# Altium PCB PROC106B_ASCII.PcbDoc (part 6 of 8)
Units mil, origin at the board's own origin, x right, y up, seen from the top; angles counter-clockwise.
Board outline 4498.18 x 1060.53 mil, 8 copper layers (Top Layer, GND1, Sig1, PWR1, PWR2, Sig2, GND2, Bottom Layer), stack 69.602 mil thick; 439 components, 327 nets, 1548 pads, 843 vias.
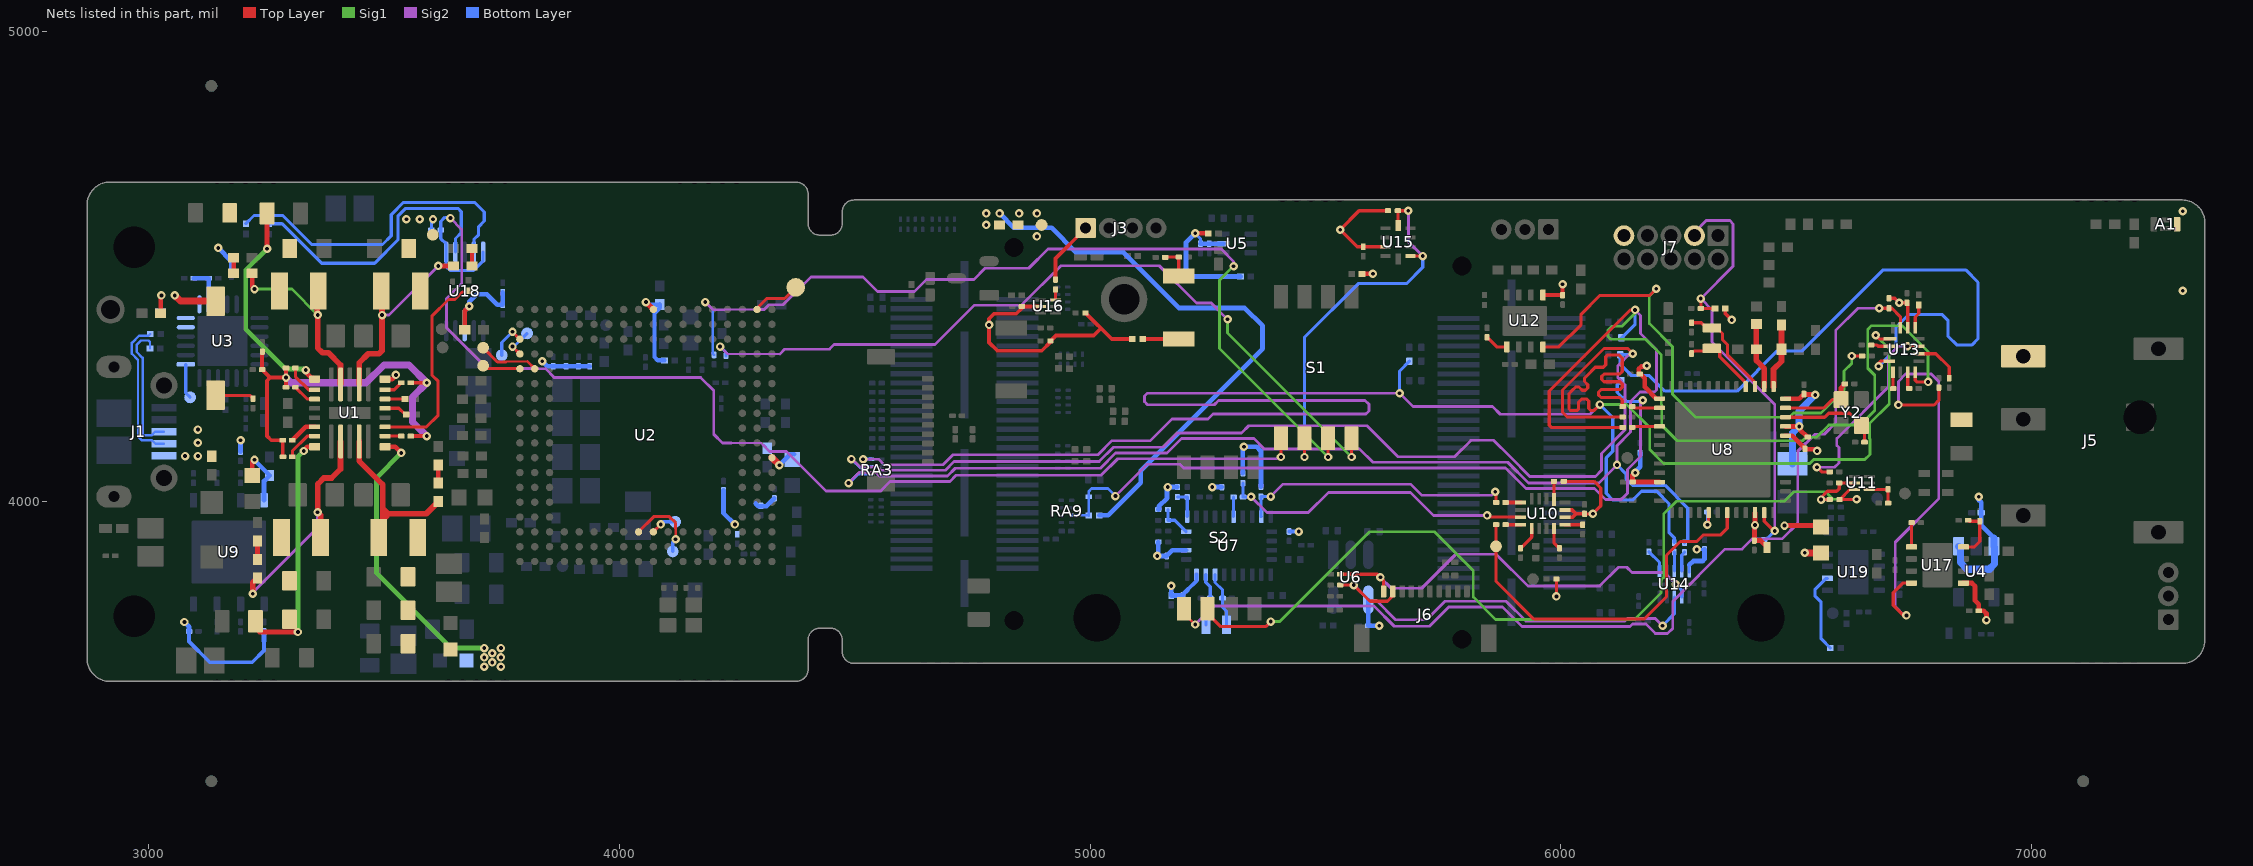
[diagram p12: the nets of this part, all layers, seen from the top]

## Via types
v1: diameter 18, hole 8, Top Layer to Bottom Layer, tented both sides, 804 vias
v2: diameter 19.68, hole 7.87, Top Layer to Bottom Layer, tented both sides, 34 vias
v3: diameter 20, hole 10, Top Layer to Bottom Layer, tented both sides, 3 vias
v4: diameter 18, hole 8, Top Layer to Bottom Layer, 1 vias
v5: diameter 17, hole 7.87, Top Layer to Bottom Layer, 1 vias

## Nets (pads, with @x,y where several pads share a name; then routed paths per layer and width w, separated by ;. In a path a pad name is that pad's centre, name@x,y a point inside that pad or via, vN(x,y) a via of type N, cw(c..) or ccw(c..) an arc to the next point about the centre after c; other vN are vias at no path point) (continued)
NetR87_2: R87.2 U8.14 | length 60.1
  Top Layer w6.7: R87.2@6151.19,4202.46 6154.4,4199.26 6195.18,4199.26 6195.18,4199.69 U8.14@6209.52,4199.69
NetR92_1: R92.1 U19.2 | length 173.6
  Bottom Layer w6.7: U19.2@6566.06,3837.67 6563.27,3837.67 6540.08,3814.48 6540.08,3799.65 6552.66,3787.07 6552.66,3709.28 R92.1@6572.2,3689.74
NetR97_1: R97.1 U7.11 | length 41.7
  Bottom Layer w6.7: U7.11@5304.72,3968.74 R97.1@5304.72,4010.48
NetR99_1: R99.1 U10.12 | length 46.8
  Top Layer w6.7: U10.12@5985.18,3943.7 5985.18,3913.36 R99.1@5996.83,3901.71
NetR100_2: R100.2 U10.5 | length 31.9
  Top Layer w8: R100.2@5882.43,3998.82 U10.5@5914.31,3998.82
NetR101_1: R101.1 U10.13 | length 37.4
  Top Layer w8: U10.13@6008.8,3951.58 R101.1@6046.19,3951.58
NetR105_1: R105.1 R106.1 U11.1 | length 69.1
  Top Layer w6.7: U11.1@6655.07,4026.51 R106.1@6695.04,4026.51 R105.1@6695.04,3997.34
NetR111_1: R111.1 SW3.2 | length 77.2
  Top Layer w8: R111.1@5111.53,4345.88 SW3.2@5188.73,4345.88
NetR112_2: R112.2 U10.8 | length 31.9
  Top Layer w8: R112.2@5882.43,3951.7 5882.56,3951.58 U10.8@5914.31,3951.58
NetR113_2: R113.2 U10.9 | length 51.8
  Top Layer w6.7: R113.2@5914.31,3901.71 5937.93,3925.33 U10.9@5937.93,3943.7
NetR115_2: R115.2 R134.1 U17.8 | length 110.4
  Top Layer w6.7: U17.8@6854.9,3904.39 6878.17,3904.39 6889.78,3916 R134.1@6889.78,3961 ; R115.2@6864.81,3961 6866.81,3959 R134.1@6889.73,3959
NetR116_1: R116.1 U17.1 | length 51.7
  Top Layer w6.7: U17.1@6744.66,3904.39 6744.66,3955.88 R116.1@6744.78,3956
NetR120_1: R120.1 U17.4 | length 925.6
  Top Layer w6.7: v1(6716.81,4206) 6792.81,4206 6802.81,4216 R120.1@6802.81,4242.98 ; v1@6734.81,3758 v1(6733.81,3759) 6727.34,3759 6705.81,3780.52 6705.81,3807.03 6726.4,3827.61 U17.4@6744.66,3827.61
  Sig2 w5.95: v1(6716.81,4206) 6716.81,4256 6732.28,4271.47 6786.63,4271.47 6802.79,4255.32 6802.79,4006.91 6710.22,3914.35 6710.22,3777.92 6729.14,3759 v1(6733.81,3759)
NetR121_1: R121.1 U13.2 | length 39.5
  Top Layer w6.7: R121.1@6659.06,4333.23 6671.58,4333.23 6674.18,4330.63 U13.2@6697.44,4330.63
NetR123_1: R123.1 U12.1 | length 50.3
  Top Layer w6.7: R123.1@5843.14,4349.69 5863.49,4329.34 U12.1@5885.05,4329.34
NetR125_2: R125.2 R129.1 SW3.1 | length 69.8
  Top Layer w5.5: R129.1@5159.27,4519.45 R129.1@5159.85,4520.03 ; SW3.1@5188.33,4480.14 SW3.1@5188.73,4479.74
  Top Layer w6.7: R129.1@5159.85,4520.03 R125.2@5188.33,4520.03 SW3.1@5188.33,4480.14
NetR127_1: R127.1 U12.4 | length 1065
  Top Layer w6.7: U12.4@5961.82,4329.34 5995.51,4329.34 6042.85,4376.69 6042.85,4399.01 6082.33,4438.49 6188.48,4438.49 v1(6202.62,4452.64) ; v1(6617.81,4310) R127.1@6639.79,4310
  Sig1 w5.95: v1(6202.62,4452.64) 6187.81,4437.82 6187.81,4378.93 6237.06,4329.68 6237.06,4228.74 6285.98,4179.83 6485.43,4179.83 6494.43,4188.83 6552.42,4188.83 6601.34,4237.75 6601.34,4277.82 6617.81,4294.3 v1(6617.81,4310)
NetR128_1: R128.1 U13.5 | length 35
  Top Layer w5.5: U13.5@6705.32,4275.51 6705.32,4241.13 R128.1@6705.74,4240.71
NetR131_2: R131.2 U8.29 | length 53.8
  Top Layer w6.7: v1(6311.16,3951.46) 6313.85,3954.16 U8.29@6313.85,3977.25
  Bottom Layer w6.7: v1(6311.16,3951.46) R131.2@6311.16,3978.41
NetR136_1: R136.1 U13.7 | length 35.8
  Top Layer w6.7: U13.7@6736.81,4275.51 6736.81,4244 R136.1@6739.81,4241
NetR139_1: R139.1 U13.10 | length 102.2
  Top Layer w6.7: U13.10@6760.43,4314.88 6796.57,4314.88 6824.81,4286.64 R139.1@6824.81,4263 R139.1@6823.09,4264.72
NetR141_1: R141.1 U13.13 | length 51.3
  Top Layer w6.7: U13.13@6752.56,4370 6752.56,4392.75 6760.03,4400.22 R141.1@6760.03,4418.23
NetR160_1: R160.1 U14.10 | length 42.6
  Bottom Layer w6.7: U14.10@6256.79,3852.92 6256.79,3887.29 R160.1@6262.64,3893.14
NetR161_2: R161.2 U8.16 | length 59.1
  Top Layer w6.7: R161.2@6151.19,4158.46 6153.05,4160.32 U8.16@6209.52,4160.32
NetR166_1: R166.1 U14.9 | length 40.8
  Bottom Layer w6.7: R166.1@6240.62,3893.58 6241.04,3893.15 U14.9@6241.04,3852.92
NetR168_1: R168.1 U14.7 | length 50.9
  Bottom Layer w6.7: R168.1@6186.75,3894.37 6209.55,3871.58 U14.7@6209.55,3852.92
NetR176_1: R176.1 S3.1 | length 82.3
  Top Layer w6.7: S3.1@3142.31,4226.42 3214.75,4226.42 R176.1@3221.71,4219.46
NetR178_2: R178.2 U16.3 | length 22.1
  Top Layer w6.7: U16.3@4926.29,4429.06 R178.2@4926.29,4451.18
NetTP2_1: TP2.1 U2.C10 | length 160.9
  Top Layer w5: v1(4119.47,3920.65) 4119.47,3943.6
  Top Layer w6.7: U2.C10@4040.73,3936.4 4073.08,3968.75 4106.27,3968.75 4119.47,3955.55 4119.47,3943.6
  Bottom Layer w6.7: TP2.1@4113.44,3894.78 4113.44,3914.63 v1(4119.47,3920.65)
NetTP3_1: TP3.1 U2.C9 | length 55
  Top Layer w6.7: U2.C9@4072.23,3936.4 v1(4087.98,3952.15)
  Bottom Layer w6.7: v1(4087.98,3952.15) 4093.63,3957.8 TP3.1@4118.39,3957.8
NetTP6_1: TP6.1 U2.T18 | length 81.8
  Top Layer w6.7: v1(3773.02,4361.6) U2.T18@3788.76,4345.85
  Bottom Layer w6.7: TP6.1@3750.12,4311.58 3750.12,4338.7 v1(3773.02,4361.6)
NetTP7_1: TP7.1 U2.R18 | length 64.8
  Top Layer w6.7: v1(3773.02,4330.1) U2.R18@3788.76,4314.36
  Bottom Layer w6.7: v1(3773.02,4330.1) 3776.1,4330.1 TP7.1@3804,4358
NetTP8_1: TP8.1 U2.P17 | length 129.1
  Top Layer w5: 3759.24,4297.12 3760.35,4298.23 3804.89,4298.23
  Top Layer w6.7: TP8.1@3710.6,4327.53 3741.01,4297.12 3759.24,4297.12 ; 3804.89,4298.23 U2.P17@3820.26,4282.86
NetTP9_1: TP9.1 U2.P18 | length 81.4
  Top Layer w6.7: TP9.1@3710.6,4289.4 3716.29,4283.71 3788.76,4283.71 U2.P18@3788.76,4282.86
NetTP11_1: TP11.1 U2.V2 | length 102.4
  Top Layer w6.7: U2.V2@4291.28,4410.27 4313.18,4432.17 4351.05,4432.17 TP11.1@4374.76,4455.87
NetTP26_1: TP26.1 U3.1 | length 74
  Bottom Layer w6.7: U3.1@3078.98,4292.21 3078.98,4231.25 TP26.1@3088.22,4222.02
nRESET: C37.1 J7.3 R89.1 R91.1 U8.35 | length 976.9
  Top Layer w6.7: v1(6297.21,4431.94) C37.1@6297.21,4411.08 R89.1@6327.17,4411.08 ; U8.35@6431.96,3977.25 6431.96,3958.78 6452.3,3938.44 v1(6454.22,3938.44)
  Sig2 w5.95: J7.3@6283.84,4565.56 6283.84,4572.59 6308.82,4597.58 6358.86,4597.58 6365.86,4590.57 6365.86,4500.59 v1(6297.21,4431.94) 6321.18,4407.97 6321.18,4339.63 6454.22,4206.59 v1(6454.22,3938.44)
  Bottom Layer w6.7: R91.1@6432.17,3920.53 ccw(c6432.17,3930.54) 6439.24,3923.46 v1(6454.22,3938.44)
PGOOD: R31.2 R37.2 R155.2 RA9.7 | length 1608.1
  Sig2 w5.95: v1(5053.68,4012.45) 5121.06,4079.83 5191.42,4079.83 5198.95,4072.3 5882.26,4072.3 5926.17,4028.39 6071.12,4028.39 6094.51,4005.01 6128.26,4005.01 6141.61,4018.37 6141.61,4069.02 6169,4096.41 6169,4210.88 v1(6173.93,4215.81)
  Bottom Layer w5.95: RA9.7@4960.68,3971.89 4996.54,3971.89 R31.2@4997.02,3971.4 R37.2@4997.02,4011.07 4997.02,4022.43 5003.06,4028.46 5037.66,4028.46 v1(5053.68,4012.45)
  Bottom Layer w6.7: R155.2@6128.35,4257.57 6119.84,4249.06 6119.84,4232.32 6138.6,4213.55 6171.67,4213.55 v1(6173.93,4215.81)
PMIC_1V0: C46.2 C49.2 C54.2 L4.1 L12.1 L14.1 U1.1 | length 615.9
  Top Layer w10: U1.1@3502.28,4117.15 3523.82,4117.15 v1(3536.85,4104.13)
  Sig1 w10: v1(3536.85,4104.13) 3484.27,4051.55 3484.27,3848.75 3643.34,3689.68 v1@3717.17,3689.68
  other v1: 3712.91,3649.87 3748.46,3649.87 3730.24,3659.02 3712.91,3669.78 3748.46,3669.78 3730.24,3678.68 3712.91,3689.68 3748.46,3689.68
PMIC_1V2: C45.2 C77.2 L3.1 L13.1 U1.14 | length 457.1
  Top Layer w10: v1(3251.69,4537.83) L13.1@3251.69,4612.77 ; v1(3333.63,4280.07) 3335.17,4278.54 3335.17,4274.43 3345.86,4263.73 3349.8,4263.73 U1.14@3352.68,4260.85
  Sig1 w10: v1(3251.69,4537.83) 3206.5,4492.63 3206.5,4366.82 3290.78,4282.54 3331.16,4282.54 v1(3333.63,4280.07)
PMIC_1V8: C47.2 C48.2 L5.1 L11.1 U1.21 | length 522.1
  Top Layer w10: L11.1@3235.24,3746.61 3235.24,3723.69 v1(3317.18,3723.69) ; v1(3329.65,4108.18) 3329.65,4109.63 3337.17,4117.15 U1.21@3352.68,4117.15
  Sig1 w10: v1(3317.18,3723.69) 3317.18,4095.71 v1(3329.65,4108.18)
PMIC_3V3: C2.1 C3.1 C44.2 C87.1 C88.1 C100.2 C101.2 C102.1 C126.2 FL22.1 L2.1 R2.2 R4.1 R5.1 R7.2 R8.2 R9.1 R19.2 R21.2 R22.2 R23.2 R31.1 R40.1 R43.2 R44.2 R45.2 R59.2 R75.1 S3.2 TP5.1 U1.8 U2.H1 U2.V9 U3.5 U3.6 U3.7 U9.8 U18.8 | length 2613
  Top Layer w10: C3.1@3025.57,4400.66 3025.57,4436.95 v1(3027.25,4438.63) ; C100.2@3220.18,4055.96 3220.18,4084.7 v1(3225,4089.52) ; U1.8@3502.28,4260.85 3517.78,4260.85 3525.31,4268.38 v1(3525.31,4269.83) ; C126.2@3671.69,4365.53 3671.69,4406.19 v1(3681.35,4415.85)
  Top Layer w12: v1(4056.48,4424.59) U2.V9@4072.23,4408.84
  Top Layer w15: v1(3055.45,4438.63) 3067.65,4426.42 S3.2@3142.31,4426.42 ; U2.H1@4324.2,4093.88 v1(4339.94,4078.14)
  Bottom Layer w6.7: R19.2@3600.71,4577.6 3600.71,4597.2 v1(3604.12,4600.61)
  Bottom Layer w8: R44.2@3085.96,3724.94 3085.96,3703.29 3129.87,3659.38 3220.09,3659.38 3245.35,3684.64 3245.35,3704.34
  Bottom Layer w9: C88.1@4085.98,4412.26 4074.41,4400.69 4074.41,4307.92 4081.57,4300.76 R2.2@4095.9,4300.76
  Bottom Layer w10: v1(3076.13,3744.96) 3085.96,3735.12 R44.2@3085.96,3724.94 ; v1(3147.81,4539.54) 3175.78,4511.57 R40.1@3175.78,4498.14 ; R45.2@3195.34,4107.12 v1@3195.34,4127.87 ; v1(3225,4089.52) 3225,4088.24 C101.2@3257.08,4056.16 3245.35,4044.42 U9.8@3245.35,4003.53 ; 3245.35,3704.34 R43.2@3245.35,3724.94 ; U18.8@3671.35,4363.67 3671.35,4405.85 v1(3681.35,4415.85) 3681.35,4425.6 3696.63,4440.88 3718.65,4440.88 3740.67,4418.85 R4.1@3752.34,4418.85 ; R4.1@3752.34,4418.85 R5.1@3752.34,4445.45 ; v1(3836.01,4298.61) 3846.58,4288.04 R21.2@3859.46,4288.04 R22.2@3886.73,4288.04 R23.2@3913.05,4288.04 R59.2@3936.98,4288.04 ; v1(4056.48,4424.59) 4062.15,4418.92 C88.1@4085.98,4418.92 ; C88.1@4085.98,4412.26 C88.1@4085.98,4418.92 ; C88.1@4085.98,4419.22 C88.1@4085.98,4418.92 ; R8.2@4221.23,4024.4 4221.23,3976.38 v1(4245.46,3952.15) ; 4289.86,3996.55 4295.2,3991.21 4295.2,3990.68 4312.51,3990.68 R7.2@4329.25,4007.42 ; v1(4339.94,4078.14) 4359.11,4097.3 4362.93,4101.12 C102.1@4371,4101.12 ; v1(4807.67,4612.77) 4838.24,4582.2 4918.25,4582.2 4969.72,4530.73 5070.03,4530.73 5188.98,4411.77 5328.57,4411.77 5366.24,4374.1 5366.24,4325.35 5107.47,4066.58 5107.47,4040.46 5038.41,3971.4 R31.1@5019.07,3971.4
  other v1: 3195.34,4131.09 4779.42,4588.36 3547.73,4600.61 3575.93,4600.61 4779.42,4612.77
PMIC_CLK: R103.2 U1.3 | length 438.9
  Top Layer w6.7: U1.3@3502.28,4159.48 3590.4,4159.48 3615,4184.08 3615,4256.43 3601.71,4269.72 3601.71,4394.6 3637.2,4430.1 3650.77,4430.1 3666.52,4445.85 3676.68,4445.85 R103.2@3679.35,4448.51
PMIC_EN1: R34.1 U1.7 | length 40.7
  Top Layer w6.7: U1.7@3502.28,4238.22 3521.94,4238.22 R34.1@3536.85,4253.13
PMIC_EN2: R35.1 U1.15 | length 70.7
  Top Layer w6.7: R35.1@3311.94,4284.61 3311.94,4266.28 3340.01,4238.22 U1.15@3352.68,4238.22
PMIC_EN3: R36.1 U1.2 | length 34.6
  Top Layer w6.7: U1.2@3502.28,4139.79 R36.1@3536.85,4139.79
PMIC_NINT: R26.1 U1.19 | length 59.2
  Top Layer w10: R26.1@3305.25,4131.09 3333.63,4159.48 U1.19@3352.68,4159.48
PMIC_NRST: R33.1 U1.20 | length 72.5
  Top Layer w6.7: R33.1@3305.52,4095.96 3305.52,4108.18 3337.13,4139.79 U1.20@3352.68,4139.79
PMIC_PGOOD: R25.1 U1.16 | length 51.1
  Top Layer w6.7: R25.1@3311.94,4243.48 3336.89,4218.53 U1.16@3352.68,4218.53
PMIC_SCL: R32.2 U1.5 | length 48
  Top Layer w6.7: U1.5@3502.28,4198.85 3531.78,4198.85 R32.2@3544.85,4185.79
PMIC_SDA: R28.2 U1.6 | length 42.6
  Top Layer w5.5: R28.2@3544.85,4218.48 R28.2@3544.85,4218.48
  Top Layer w6.7: U1.6@3502.28,4218.53 R28.2@3544.85,4218.48
PMICVIO_3V3: R25.2 R26.2 R33.2 R34.2 R35.2 R36.2 R50.1 R52.2 | length 878.4
  Top Layer w8: R50.1@3241.63,4319.41 3241.09,4318.88 R52.2@3241.09,4281.06 3258.11,4264.05 ; R33.2@3285.49,4095.96 3285.23,4096.22 R26.2@3285.23,4131.09 3260.47,4131.09 3251.36,4140.2 3251.36,4257.3 3258.11,4264.05 ; R25.2@3291.92,4243.48 v1(3291.92,4264.05) ; R35.2@3291.92,4284.61 v1(3291.92,4264.05) ; R36.2@3556.87,4139.79 v1(3590.95,4139.79) ; R34.2@3556.87,4253.13 v1(3590.95,4253.13) ; 3258.11,4264.05 v1(3291.92,4264.05)
  Sig2 w15: v1(3291.92,4264.05) 3302.83,4253.13 3462.07,4253.13 3499.77,4290.83 3553.26,4290.83 v1(3590.95,4253.13) 3560.74,4222.92 3560.74,4170 v1(3590.95,4139.79)
PS0: R77.2 R93.1 U7.6 | length 62.7
  Bottom Layer w6.7: R77.2@5185.3,4010.48 R93.1@5206.3,4010.48 U7.6@5206.3,3968.74
PS1: R78.2 R98.1 U7.5 | length 71.4
  Bottom Layer w6.7: R78.2@5165.52,3984 R98.1@5165.52,3961 5179.58,3961 U7.5@5203.84,3936.75
RE: A1.1
  other v1: 7320.92,4448.37 7320.92,4617.37
RESETN: R94.1 U10.1 | length 39
  Top Layer w6.7: U10.1@5985.18,4004.73 R94.1@5985.18,4043.69
RF_N: C23.1 L6.1 U8.2 | length 139.8
  Top Layer w12: L6.1@6415.18,4377.75 6415.09,4377.66 C23.1@6415.09,4324.42 6415.09,4300.45 6431.96,4283.58 U8.2@6431.96,4244.97
RF_P: C22.2 L1.1 U8.1 | length 137.8
  Top Layer w12: U8.1@6451.65,4244.97 6451.65,4281.73 6468.52,4298.6 L1.1@6468.52,4324.41 C22.2@6468.51,4375.79
SENS_INT: R18.2 R100.1 U7.14 | length 589
  Top Layer w6.7: v1(5860.53,4021.62) 5862.41,4019.74 R100.1@5862.41,3998.82
  Sig2 w5.95: v1(5383.46,4011.31) 5409.9,4037.75 5680.81,4037.75 5704.56,4014 5852.9,4014 v1(5860.53,4021.62)
  Bottom Layer w5.5: R18.2@5362.78,4011.28 R18.2@5363.28,4010.78
  Bottom Layer w6.7: U7.14@5363.78,3968.74 5362.78,3969.74 R18.2@5362.78,4011.28 v1@5383.43,4011.28
SENS_NRST: R81.2 R97.2 U10.7 | length 677
  Top Layer w6.7: v1(5843.14,3971.4) 5846.67,3967.88 5913.76,3967.88 U10.7@5914.31,3967.32
  Sig2 w5.95: v1(5341.84,4011.07) 5375.53,3977.37 5463.23,3977.37 5506.2,4020.34 5680.27,4020.34 5729.21,3971.4 v1(5843.14,3971.4)
  Bottom Layer w5.5: v1(5341.84,4011.07) 5342.12,4010.78 5345.19,4010.78 v1@5344.89,4010.48
  Bottom Layer w6.7: R81.2@5324.41,4039.9 5324.41,4010.82 R97.2@5324.75,4010.48 5341.25,4010.48 v1(5341.84,4011.07)
SOP0: R159.2 S1.3 | length 1902
  Top Layer w6.7: v1(5505.37,4095.46) S1.3@5505.37,4135.46
  Sig1 w5.95: v1(5304.72,4500.76) 5274.9,4470.94 5274.9,4325.94 v1(5505.37,4095.46)
  Sig2 w4.5: 4223.14,4408.84 4293.24,4408.84
  Sig2 w5.95: v1(4182.46,4424.59) 4198.79,4408.27 4222.56,4408.27 ; 4293.24,4408.84 4307.81,4408.84 4317.84,4418.87 4347.94,4418.87 4406.85,4477.78 4517.43,4477.78 4548.43,4446.78 4626.58,4446.78 4652.24,4472.44 4753.09,4472.44 4776.93,4496.28 4869.62,4496.28 4910.57,4537.24 5278.49,4537.24 5304.72,4511 v1(5304.72,4500.76)
  Bottom Layer w5: v1(4182.46,4424.59) 4198.53,4408.53 4198.26,4408.26 4198.26,4315.13 R159.2@4201.23,4312.16
SOP1: R171.2 S1.4 | length 1675.6
  Top Layer w6.7: v1(5555.37,4095.46) S1.4@5555.37,4135.46
  Sig1 w5.95: v1(5292.01,4387.88) 5292.01,4358.83 v1(5555.37,4095.46)
  Sig2 w4.5: v1(4213.96,4330.1) 4229.71,4314.36 4341.35,4314.36
  Sig2 w5.95: 4341.35,4314.36 4351.45,4324.45 4446.13,4324.45 4456.22,4334.55 4670.75,4334.55 4754.18,4417.98 4854.38,4417.98 4937.96,4501.55 5146.92,4501.55 5225.73,4422.74 5257.14,4422.74 v1(5292.01,4387.88)
  Bottom Layer w6.7: v1(4213.96,4330.1) 4226.45,4317.61 R171.2@4226.45,4310.42
SPI/CAN_MUX_CTRL: R118.1 S2.1 U13.15 | length 2179.9
  Top Layer w5.5: S2.1@5199.37,3773.46 5194.37,3768.46 v1(5223.17,3739.66)
  Top Layer w6.7: v1(6676.29,4411.48) R118.1@6696.81,4411.48 6703.33,4411.48 6721.06,4393.75 U13.15@6721.06,4370
  Sig2 w5.95: v1(5223.17,3739.66) 5262.38,3778.87 5602.98,3778.87 5646.06,3735.8 5720.58,3735.8 5761.88,3777.1 5875.72,3777.1 5917.56,3735.26 6146.44,3735.26 6151.79,3740.61 6180.59,3740.61 6200.56,3720.65 6226.68,3720.65 6237.45,3731.42 6237.45,3788.77 6348.32,3899.63 6384.69,3899.63 6407.03,3921.97 6470.34,3921.97 6503.17,3954.8 6503.17,4107.57 6539.43,4143.83 6559.48,4143.83 6583.65,4168 6583.65,4364.13 6631.01,4411.48 v1(6676.29,4411.48)
SPI_CLK1: R151.2 R160.2 R161.1 RA3.2 U13.8 | length 4325
  Top Layer w6.7: R161.1@6131.17,4158.46 5979.38,4158.46 5975.27,4162.58 5975.27,4235.61 6147.42,4407.76 v1(6157.61,4407.76) ; U13.8@6752.56,4275.51 6752.56,4258.25 6755.81,4255 v1(6779.81,4255)
  Sig1 w5.95: v1(6157.61,4407.76) 6157.61,4400.83 6130.04,4373.26 6108.23,4373.26 6099.8,4364.84 6099.8,4351.52 6105.77,4345.55 6179.95,4345.55 6213.27,4312.23 6213.27,4206.95 6214.25,4205.98 6214.25,4162.84 6247.09,4130 6513.57,4130 6520.9,4137.33 6543.07,4137.33 6569.11,4163.38 6635.6,4163.38 6666.75,4194.52 6666.75,4269.04 6651.85,4283.94 6651.85,4366.63 6659.6,4374.38 6724.74,4374.38 6779.81,4319.31 v1(6779.81,4255)
  Sig2 w5.95: v1(4486.92,4040) 4509.41,4062.49 4544.84,4062.49 4552.13,4055.2 4697.06,4055.2 4713.43,4071.58 5021.63,4071.58 5053.67,4103.62 5163.24,4103.62 5194.28,4134.66 5347.84,4134.66 5369.78,4112.71 5572.06,4112.71 5600.59,4084.19 5887.19,4084.19 5931.09,4040.29 6080.55,4040.29 6118.88,4078.61 v1(6119.14,4078.61) 6119.14,4119.33 6148.08,4148.27 6148.08,4213.05 6168.31,4233.27 6198.76,4233.27 6203.07,4237.58 6203.07,4323.68 6169.29,4357.46 6169.29,4396.08 v1(6157.61,4407.76)
  Bottom Layer w6.7: v1(4486.92,4040) 4506.08,4059.16 4531.17,4059.16 4531.36,4059.36 RA3.2@4535.95,4059.36 ; v1(6119.14,4078.61) 6138,4059.75 6138,4049.46 6152.39,4035.07 6221.28,4035.07 6269.58,3986.76 6269.58,3920.11 R160.2@6262.64,3913.17 ; R151.2@6128.21,4348.48 6129,4348.48 6157.61,4377.09 v1(6157.61,4407.76)
SPI_CLK1_T: J6.1 R185.1 U14.2 | length 879.9
  Top Layer w6.7: R185.1@5531.01,3846.49 5609.9,3846.49 v1(5616.61,3839.78) 5623.32,3833.07 J6.1@5623.32,3810.06
  Sig2 w5.95: v1(5616.61,3839.78) 5639.62,3816.77 5704.53,3816.77 5776.5,3888.73 5862.44,3888.73 5929.9,3821.27 6082.33,3821.27 6122.39,3861.33 6139.78,3861.33 6151.11,3850 6219.39,3850 v1(6244.03,3825.36)
  Bottom Layer w6.7: v1(6244.03,3825.36) 6256.79,3812.6 U14.2@6256.79,3797.8
SPI_CS1: R74.1 U13.11 | length 429.1
  Top Layer w5.5: v1(6736.18,4330.63) U13.11@6760.43,4330.63
  Top Layer w6.7: v1(6543.91,4073.7) 6544.18,4073.7 6553.96,4063.92 R74.1@6571.09,4063.92
  Sig2 w5.95: v1(6543.91,4073.7) 6581.52,4073.7 6590.67,4082.85 6590.67,4115.3 6586.1,4119.86 6586.1,4135.05 6695.76,4244.71 6695.76,4309.35 6717.05,4330.63 v1(6736.18,4330.63)
SPI_CS_MUX_CTRL: R104.1 S2.2 U11.6 | length 1884.9
  Top Layer w6.7: S2.2@5249.37,3773.46 5249.37,3763.6 5277.84,3735.13 5372.76,3735.13 v1(5383.46,3745.84) ; U11.6@6623.57,4026.51 6613.5,4026.51 R104.1@6591.99,4005 6622.99,4005 6623.57,4005.59 v1(6628.05,4005.59)
  Sig1 w5.95: v1(5383.46,3745.84) 5402.84,3745.84 5593.62,3936.62 5731.27,3936.62 5813.97,3853.92 5813.97,3797.67 5861.45,3750.19 6156.27,3750.19 6212.51,3806.42 6212.51,3833.75 6218.27,3839.5 6218.27,3974.42 6245.38,4001.54 6474.92,4001.54 6495.07,4021.7 6561.94,4021.7 6578.05,4005.59 v1(6628.05,4005.59)
SPI_MISO1: R87.1 R154.1 R166.2 RA3.4 U13.1 | length 4756.8
  Top Layer w6.7: 6063.42,4193.97 6069.81,4193.97 v1(6082.75,4206.91) ; 6063.42,4194.34 6059.2,4198.55 6059.2,4214.4 6055.19,4218.42 6043.75,4218.42 6037.53,4212.2 6037.53,4197.99 6033.52,4193.97 6020.58,4193.97 6017.07,4197.49 6017.07,4229.93 6022.97,4235.83 6031.24,4244.1 6038.32,4244.1 6045.16,4237.27 6052.24,4237.27 6056.97,4241.99 6056.97,4249.07 6050.13,4255.91 6050.13,4262.99 6055.47,4268.33 6073.09,4285.95 6089.86,4285.95 6095.36,4291.45 6095.36,4308.22 6099.58,4312.44 6123.13,4312.44 6130.34,4305.22 6130.34,4276.86 6125.33,4271.85 6091.87,4271.85 6086.86,4266.84 6086.86,4260.16 6091.87,4255.15 6125.33,4255.15 6130.34,4250.14 6130.34,4243.46 6125.33,4238.45 6085.16,4238.45 6080.15,4233.44 6080.15,4226.76 6085.16,4221.75 6125.33,4221.75 6130.34,4216.74 6130.34,4203.29 R87.1@6131.17,4202.46 ; v1(6668.81,4354) 6676.43,4346.38 U13.1@6699.41,4346.38
  Sig1 w5.95: v1(6082.75,4206.91) 6139.6,4206.91 6188.75,4157.76 6188.75,4110.98 6218.01,4081.72 6528.63,4081.72 6537.08,4090.17 6645.43,4090.17 6656.26,4101 6656.26,4133.46 6655.28,4134.44 6655.28,4166.24 6697.59,4208.55 6697.59,4294.1 6697.45,4294.25 6697.45,4317.75 6697.59,4317.9 6697.59,4325.22 v1(6668.81,4354)
  Sig2 w5.95: v1(4517.69,4090.85) 4550.12,4090.85 4561.98,4078.99 4687.2,4078.99 4708.33,4100.11 5016.53,4100.11 5046.57,4130.16 5127.86,4130.16 5174.04,4176.34 5250.52,4176.34 5260.82,4186.64 5585.45,4186.64 5592.29,4193.48 5592.29,4207.43 5584.11,4215.6 5272.9,4215.6 5263.66,4206.36 5122.15,4206.36 5115.56,4212.95 5115.56,4224.91 5121.64,4230.99 v1(5657.37,4230.99) 5685.71,4202.64 5854.79,4202.64 5871.27,4186.17 6062.01,4186.17 v1(6082.75,4206.91)
  Bottom Layer w6.7: v1(4517.69,4090.85) RA3.4@4535.95,4090.85 ; v1(5657.37,4230.99) 5657.37,4278.16 R154.1@5678.13,4298.93 ; v1(6082.75,4206.91) 6110.19,4179.47 6110.19,4107.35 6096.33,4093.49 6096.33,4018.14 6110.26,4004.22 6152.95,4004.22 6171.26,4022.52 6203.4,4022.52 6229.38,3996.55 6229.38,3935.32 6240.62,3924.08 R166.2@6240.62,3913.6
SPI_MISO1_T: J6.2 R184.1 U14.3 | length 939.9
  Top Layer w6.7: R184.1@5531.18,3823.28 v1(5560.18,3823.28) 5594.55,3788.91 5631.55,3788.91 5643.01,3800.37 J6.2@5643.01,3810.06
  Sig2 w5.95: v1(5560.18,3823.28) 5592.7,3790.77 5607.91,3790.77 5648.88,3749.8 5714.78,3749.8 5753.98,3789 5883.62,3789 5925.46,3747.16 6135.69,3747.16 6141.05,3752.51 6200.45,3752.51 v1(6215.84,3737.12)
  Bottom Layer w6.7: v1(6215.84,3737.12) 6241.04,3762.32 U14.3@6241.04,3797.8
SPI_MOSI1: R86.1 R153.2 RA3.3 U13.4 | length 3868.3
  Top Layer w6.7: R86.1@6131.02,4180.57 6013.04,4180.57 6003.51,4190.11 6003.51,4237.7 6091.65,4325.84 6141.89,4325.84 v1(6152.82,4314.92) ; v1(6674.81,4288) 6674.81,4294.5 6679.45,4299.13 U13.4@6697.44,4299.13
  Sig2 w5.95: v1(4493,4091) 4494.25,4091 4510.87,4074.38 4549.77,4074.38 4557.05,4067.1 4692.13,4067.1 4711.01,4085.97 5019.2,4085.97 5049.49,4116.26 5154.64,4116.26 5184.93,4146.55 5321.51,4146.55 5336.83,4161.88 5588,4161.88 5653.79,4096.09 5774.21,4096.09 5808.94,4130.81 5857.47,4130.81 5891.66,4096.63 5891.66,4096.54 5933.94,4054.26 6073.1,4054.26 6086.14,4067.3 6086.14,4103.14 6136.19,4153.2 6136.19,4248.75 6120.66,4264.28 6120.66,4289.02 6146.56,4314.92 v1(6152.82,4314.92)
  Bottom Layer w6.7: v1(4493,4091) 4493.79,4091 4512.23,4072.56 4525.61,4072.56 4528.16,4075.11 RA3.3@4535.95,4075.11 ; v1@6152.82,4312.59 R153.2@6126.12,4312.59 6126.12,4292.58 6150.28,4268.42 6187.86,4268.42 6220.8,4235.48 6374.36,4235.48 6459.75,4320.87 6512.8,4320.87 6684.75,4492.82 6859.64,4492.82 6886.05,4466.4 6886.05,4346.31 6873.37,4333.63 6840.48,4333.63 6822.6,4351.51 6822.6,4384.73 6808.88,4398.45 6739.36,4398.45 6711.55,4370.64 6711.55,4324.74 v1(6674.81,4288)
SRDY: R112.1 TP27.1 U8.31 | length 809.2
  Top Layer w6.7: R112.1@5862.41,3951.7 5862.41,3905.96 TP27.1@5862.18,3905.74 5862.18,3831.62 5942.67,3751.13 6176.53,3751.13 6224.18,3798.77 6224.18,3886.56 6253.68,3916.06 6288.86,3916.06 6302.89,3930.09 6339.36,3930.09 6353.22,3943.95 U8.31@6353.22,3977.25
SW0: L2.2 R53.2 U1.10 | length 440.3
  Top Layer w10: v1(3615.39,4501.24) R53.2@3647.82,4501.24
  Top Layer w12: U1.10@3447.16,4249.63 3447.16,4295.44 3466.54,4314.82 3489.47,4314.82 3495.89,4321.24 v1(3495.89,4396.79) 3495.89,4452.04 L2.2@3489.45,4458.48
  Sig2 w5.95: v1(3495.89,4396.79) 3510.94,4396.79 v1(3615.39,4501.24)
SW0_CAP: C31.1 R53.1 | length 37.1
  Top Layer w8: R53.1@3687.19,4501.24 C31.1@3687.19,4538.34
SW1: L3.2 R54.2 U1.12 | length 424.2
  Top Layer w10: R54.2@3220.03,4485.56 3220.03,4457.01 v1(3225,4452.04)
  Top Layer w12: v1(3359.17,4397.16) v1@3359.17,4395.95 ; L3.2@3365.61,4448.85 3357.96,4441.2 3357.96,4397.16 v1@3359.17,4395.95 ; U1.12@3407.79,4249.63 3407.79,4291.03 3382.08,4316.74 3369.33,4316.74 3359.17,4326.9 v1@3359.17,4395.95
  Sig1 w5.95: v1(3225,4452.04) 3304.28,4452.04 v1(3359.17,4397.16)
SW1_CAP: C32.1 R54.1 | length 32.9
  Top Layer w10: R54.1@3180.66,4485.56 C32.1@3180.66,4518.49
SW2: L4.2 R55.2 U1.25 | length 339.7
  Top Layer w12: U1.25@3447.16,4128.37 3447.16,4086.98 3497.1,4037.05 3497.1,3986.55 ; L4.2@3496.99,3961.52 L4.2@3497.1,3961.63 ; R55.2@3615.39,4000.53 3589.87,3975.02 3507.05,3975.02 ; L4.2@3497.1,3961.63 3507.05,3971.58 3507.05,3975.02 ; L4.2@3497.1,3961.63 3497.1,3986.55 ; 3497.1,3986.55 3507.05,3976.61 3507.05,3975.02
SW2_CAP: C33.2 R55.1 | length 38.8
  Top Layer w10: R55.1@3615.39,4039.9 C33.2@3615.39,4078.74
SW3: L5.2 R56.2 U1.23 | length 510.6
  Top Layer w12: v1(3221.07,3804.79) 3221.07,3828.39 R56.2@3231.35,3838.68 ; L5.2@3365.51,3919.52 3365.51,3971.86 v1(3359.07,3978.3) 3359.07,4038.18 3359.6,4038.18 3372.17,4050.75 3388.9,4050.75 3407.79,4069.64 U1.23@3407.79,4128.37
  Sig2 w5.95: v1(3221.07,3804.79) 3221.07,3807.15 3359.07,3945.15 v1(3359.07,3978.3)
SW3_CAP: C34.2 R56.1 | length 38.9
  Top Layer w10: R56.1@3231.35,3878.05 C34.2@3231.35,3917
UART_MUX_CTRL1: R19.1 S1.1 U18.1 U18.5 | length 2531.7
  Top Layer w6.7: v1(5405.37,4095.46) S1.1@5405.37,4135.46
  Sig2 w4.5: 3828.67,4282.86 3842.32,4282.86 3842.94,4283.48 ; 4237.91,4125.38 4300.76,4125.38 4304.53,4121.62
  Sig2 w5.95: v1(3641.13,4602.92) 3665.03,4579.02 3665.03,4464.29 3632.83,4432.1 3632.83,4370.07 3719.32,4283.58 3827.95,4283.58 3828.67,4282.86 ; 3842.94,4283.48 3861.83,4264.58 4172.68,4264.58 4200.64,4236.63 4200.64,4143.76 4219.02,4125.38 4237.91,4125.38 ; 4304.53,4121.62 4318.78,4107.36 4354.87,4107.36 4438.8,4023.43 4555.14,4023.43 4575.02,4043.31 4701.98,4043.31 4715.52,4056.84 5023.72,4056.84 5058.6,4091.73 5401.64,4091.73 v1(5405.37,4095.46)
  Bottom Layer w6.7: v1(3641.13,4602.92) 3639.63,4604.42 3629.45,4604.42 3620.74,4595.71 R19.1@3620.74,4577.6 3620.74,4559.26 3631.98,4548.02 U18.1@3631.98,4530.99 3631.98,4499.84 3640.25,4491.57 3690.32,4491.57 3710.72,4511.98 U18.5@3710.72,4530.99
UART_MUX_CTRL2: R1.1 S1.2 U15.1 U15.5 | length 819.7
  Top Layer w6.7: v1(5455.37,4095.46) S1.2@5455.37,4135.46 ; U15.5@5654.19,4587.22 5653.69,4587.73 R1.1@5653.69,4618.56 v1(5675.9,4618.59) ; U15.1@5680.77,4522.26 v1(5706.58,4522.26)
  Sig2 w6.7: v1(5675.9,4618.59) 5675.9,4552.94 v1(5706.58,4522.26)
  Bottom Layer w6.7: v1(5455.37,4095.46) 5455.37,4349.9 5569.14,4463.66 5671.93,4463.66 5706.58,4498.31 v1(5706.58,4522.26)
USB_5V: FL2.1 J1.1
  other v1: 3077.51,4097.43 3104.7,4097.43 3104.7,4125.62 3104.7,4153.82
USB_AR_RS232RX: R63.1 U18.2 | length 614.1
  Bottom Layer w6.7: R63.1@3255.87,4590.83 3283.69,4590.83 3367.49,4507.03 3480.1,4507.03 3529.51,4556.44 3529.51,4606.69 3546.31,4623.49 3657.2,4623.49 3664,4616.69 3664,4571.71 3651.86,4559.57 ; U18.2@3651.67,4530.99 3651.67,4559.57
USB_AR_RS232TX: R62.1 U18.4 | length 705.1
  Bottom Layer w6.7: R62.1@3206.51,4591.24 3223.81,4608.54 3284.94,4608.54 3346.73,4546.75 3497,4546.75 3515.39,4565.14 3515.39,4610.32 3541.11,4636.04 3692.88,4636.04 3713.04,4615.88 3713.04,4596.78 3701.04,4584.77 3701.04,4567.45 3691.04,4557.45 U18.4@3691.04,4530.99
USB_DM: J1.2 R60.2 | length 312.5
  Bottom Layer w5: R60.2@3003.52,4356.6 2999.85,4352.92 2979.71,4352.92 2964.56,4337.77 2964.56,4314.77 2977.52,4301.8 2977.52,4138.83 2985.04,4131.3 3006.86,4131.3 3014.61,4123.56 J1.2@3032.66,4123.56
USB_DP: J1.3 R41.2 | length 292.2
  Bottom Layer w5: R41.2@3002.89,4326.25 3002.89,4339.95 2999.92,4342.92 2983.85,4342.92 2974.56,4333.63 2974.56,4318.91 2987.41,4306.05 2987.52,4305.94 2987.52,4142.97 2989.19,4141.3 3006.11,4141.3 3013.95,4149.15 J1.3@3032.66,4149.15
VBUS: R64.2 R65.2 U3.8 | length 87
  Bottom Layer w10: R64.2@3096.15,4475.15 R65.2@3127.78,4475.15 U3.8@3127.78,4419.75
VCC_BA_3V3: C5.1 C6.2 C9.2 C10.2 C11.1 C12.2 C40.1 C72.2 C105.2 C107.1 C109.2 C117.1 C119.1 C123.1 C125.1 FL22.2 J3.1 J7.9 L8.1 R1.2 R13.1 R16.1 R18.1 R38.2 R72.1 R77.1 R78.1 R80.1 R81.1 R82.1 R89.2 R94.2 R95.2 R104.2 R111.2 R118.2 R124.2 R177.1 R178.1 TP13.1 U4.1 U4.3 U5.5 U6.4 U7.3 U7.28 U10.14 U10.15 U11.5 U12.5 U13.14 U14.11 U15.8 U16.5 U17.5 | length 2941.2
  Top Layer w6.7: v1(5990.47,3799.31) R95.2@5990.47,3836.09 ; R94.2@6006.21,4043.69 6070.57,4043.69 6084.6,4029.67 6084.6,3991.13 6082.93,3989.46 6082.75,3989.46 v1(6068,3974.71) C117.1@6050.15,3974.71 ; R104.2@6570.96,4005 v1(6552.57,4005) 6552.57,4009.25 6566.03,4022.71 6585.71,4022.71 6591.11,4028.11 C40.1@6591.11,4040.29 U11.5@6623.57,4040.29 ; R118.2@6696.81,4432.52 6709.29,4432.52 v1(6718.6,4423.21) C107.1@6735.03,4423.21 6736.81,4421.43 U13.14@6736.81,4370
  Top Layer w8: U16.5@4894.79,4415.28 C72.2@4855.01,4415.28 4855.01,4411.59 4843.01,4399.58 4795.92,4399.58 4785.33,4388.99 v1(4785.33,4376.1) 4785.33,4338.93 4803.26,4320.99 4897.25,4320.99 4915.83,4339.57 R124.2@4915.83,4342.12 4927.17,4353.46 5007.56,4353.46 5022.84,4368.75 5008.56,4383.04 ; R178.1@4926.29,4472.22 4926.29,4517.21 4990.56,4581.48 J3.1@4990.29,4581.75 ; R177.1@4990.14,4401.5 5045.76,4345.88 R111.2@5089.49,4345.88 ; U15.8@5627.62,4541.95 C123.1@5580.17,4541.95 5567.55,4541.95 v1(5531.18,4578.33) 5571.41,4618.56 R1.2@5632.65,4618.56 ; U12.5@5961.82,4439.58 5961.95,4439.45 C105.2@6003.52,4439.45 ; v1(6003.44,4462.27) 6003.44,4439.53 C105.2@6003.52,4439.45 ; C105.2@6003.64,4439.33 C105.2@6003.52,4439.45 ; U10.14@6008.8,3967.32 6024.78,3967.32 6032.17,3974.71 ; U10.15@6008.8,3983.07 6023.81,3983.07 6032.17,3974.71 ; C117.1@6050.15,3974.71 6032.17,3974.71 ; R89.2@6349.22,4411.08 6349.22,4400.27 v1(6362.92,4386.56)
  Top Layer w10: v1(5223.17,4570.56) 5223.25,4570.64 R13.1@5250.79,4570.64 ; R16.1@5577.42,4484.46 5600.32,4484.46 v1(5600.59,4484.74) ; U17.5@6854.9,3827.61 6873.17,3827.61 6879.78,3821 6879.78,3790.43 6887.42,3782.79 C109.2@6887.42,3768.9 6897.81,3768.9 6903.81,3762.9 v1(6903.81,3749)
  Top Layer w15: v1@6518.19,3891.83 L8.1@6552.57,3891.83
  Bottom Layer w5.5: C11.1@5172.1,3801.28 C11.1@5172.24,3801.43 ; C9.2@5196.95,3801.43 C9.2@5197.1,3801.57 C9.2@5197.1,3803.37
  Bottom Layer w6: U14.11@6272.54,3850.95 U14.11@6272.54,3866.08
  Bottom Layer w6.7: v1(5223.17,4570.56) 5234.38,4559.36 C6.2@5234.38,4548.71 ; v1(6288.47,3899.2) C119.1@6304.91,3899.2
  Bottom Layer w8: 5207.55,3813.82 5225.98,3832.25 U7.28@5225.98,3845.7 ; v1(5259.36,4031.52) v1@5260.09,4032.25 ; R72.1@5422.76,3937.25 5422.88,3937.13 5442.81,3937.13 v1(5442.93,3937)
  Bottom Layer w10: R78.1@5144.48,3984 5145.78,3984 5146.14,3984.36 5146.14,3990.56 5163.4,4007.82 5163.4,4029.99 v1(5164.93,4031.52) R77.1@5185.3,4031.52 ; R80.1@5144.96,3915 5144.96,3887.63 v1(5142.51,3885.18) C10.2@5162.69,3885.18 5174.88,3897.38 U7.3@5203.84,3897.38 ; C11.1@5172.1,3801.43 v1(5172.1,3821.6) ; C11.1@5172.24,3801.43 C9.2@5196.95,3801.43 ; C9.2@5197.1,3803.37 5207.55,3813.82 ; v1(5223.17,4570.56) 5203.84,4551.22 5203.84,4492.98 5218,4478.82 R38.2@5319.45,4478.82 ; C6.2@5234.38,4548.71 C125.1@5252.95,4548.71 U5.5@5283.23,4548.71 ; v1(5259.36,4031.52) R82.1@5279.72,4031.52 ; R81.1@5324.41,4060.94 5324.41,4114.87 v1(5326.65,4117.12) 5353.72,4117.12 5362.78,4108.06 R18.1@5362.78,4032.31 ; U6.4@5590.94,3792.16 C12.2@5590.94,3737.11 v1(5613.91,3737.11) ; U14.11@6272.54,3866.08 6280.92,3874.46 6301.2,3874.46 6304.91,3878.17 C119.1@6304.91,3899.2 ; v1(6887.74,4011.25) 6887.74,4003.81 6892.68,3998.87 C5.1@6892.68,3977 6892.68,3950.48 U4.3@6919.58,3923.58
  Bottom Layer w15: U4.1@6844.78,3905.76 6848.43,3902.11 6848.43,3871.38 6862.81,3857 6909.81,3857 6920.81,3868 6920.81,3904.53 U4.3@6919.58,3905.76 U4.3@6919.58,3923.58
  other v1: 6518.19,3892.23 4886.95,4563.95 4849.03,4612.77 4886.95,4612.77
VDDR: C29.1 C35.1 C36.1 L7.2 U8.45 U8.48 | length 294.5
  Top Layer w10: U8.45@6477.24,4160.32 6477.31,4160.39 6506.11,4160.39 v1(6506.18,4160.46) 6507.71,4158.93 6507.71,4153.36 6522.85,4138.22 C35.1@6524.64,4138.22 ; U8.48@6477.24,4219.38 6506.43,4219.38 C36.1@6516.27,4229.22 6516.27,4228.39 6516.44,4228.22 6539.09,4228.22 v1(6540.09,4227.23)
  Bottom Layer w15: L7.2@6491.96,4080.83 C29.1@6491.97,4137.37 6491.97,4146.25 v1(6506.18,4160.46) 6506.18,4193.32 v1(6540.09,4227.23)
VDDS: C25.1 C26.1 C27.1 C28.1 C86.1 L8.2 R110.2 U8.13 U8.22 U8.34 U8.44 | length 487.2
  Top Layer w10: v1@6157.19,4062.2 6152.19,4057.2 C26.1@6152.19,4042.21 U8.22@6209.52,4042.21 ; v1(6182.47,4289.2) 6180.94,4287.67 6170.56,4287.67 6165.61,4282.72 6165.61,4271.56 6165.78,4271.39 C25.1@6167.35,4271.39 6169.15,4271.39 6178.1,4262.44 6178.1,4244.27 6202.99,4219.38 U8.13@6209.52,4219.38 ; U8.34@6412.28,3977.25 v1(6412.28,3950.73) 6411.02,3949.47 6411.02,3918.09 C86.1@6410.84,3917.92 6424.27,3917.92 6438.05,3904.14 C28.1@6438.05,3903.24 ; v1(6474.93,3949.86) 6549.37,3949.86 L8.2@6552.57,3946.66 ; U8.44@6477.24,4140.64 6477.51,4140.36 6491.23,4140.36 6516.45,4115.15 6518.25,4115.15 6518.42,4114.97 C27.1@6518.42,4113.17 6518.42,4112.06 6518.59,4111.89 6538.59,4111.89 6542.02,4108.46 v1(6544.18,4108.46)
  Bottom Layer w10: v1(6158.08,4062.2) 6158.08,4064.36 6168.27,4074.55 R110.2@6168.27,4104.23
VIN_5V_B: J5.1 L15.1
X32K_Q1: C19.1 U8.3 Y3.1 | length 216.5
  Top Layer w6.7: C19.1@6277.6,4380.71 6298.4,4380.71 6309.53,4369.58 Y3.1@6320.71,4369.58 6331.42,4369.58 6343.35,4357.65 6343.35,4344.38 6353.86,4333.87 6353.86,4312.81 6412.28,4254.39 U8.3@6412.28,4244.97
X32K_Q2: C20.1 U8.4 Y3.2 | length 164.5
  Top Layer w6.7: C20.1@6277.6,4315.14 6282.8,4320.34 6291.16,4320.34 6291.2,4320.37 6304.91,4320.37 6304.94,4320.34 6314.77,4320.34 Y3.2@6320.71,4326.27 6330.35,4326.27 6337.44,4319.18 6337.44,4308.18 6392.59,4253.03 U8.4@6392.59,4244.97
X48M_N: C18.1 U8.46 Y2.3 | length 213.8
  Top Layer w6.7: U8.46@6477.24,4180.01 6560.18,4180.01 6568.53,4188.35 6613.06,4188.35 6638.36,4163.06 6644.88,4156.53 C18.1@6644.88,4127.04
X48M_P: C17.1 U8.47 Y2.1 | length 162.1
  Top Layer w6.7: U8.47@6477.24,4199.69 6559.04,4199.69 6576.76,4217.41 Y2.1@6595.05,4217.41
  Top Layer w10: Y2.1@6595.05,4217.41 6595.05,4242.62 C17.1@6603.32,4250.88
XIN32: C38.1 U7.27 Y4.1 | length 114.6
  Bottom Layer w6.7: U7.27@5245.67,3845.7 5245.67,3829.53 5255.25,3819.94 C38.1@5255.25,3795.56 5255.25,3772.96 5246.17,3763.87 Y4.1@5246.17,3738.88
XOUT32: C39.1 U7.26 Y4.2 | length 116.8
  Bottom Layer w6.7: U7.26@5265.35,3845.7 5265.35,3828.79 5281.32,3812.82 C39.1@5281.32,3795.56 5281.32,3776.47 5289.47,3768.32 Y4.2@5289.47,3738.88
pads on no net: A1.2-3 A1.5-6 Designator1. Designator1_2. Designator6. Designator7. Designator7_1. Designator8. Designator22_1. Designator23. FID1.1 FID2.1 FID3.1 FID4.1 FID5.1 FID6.1 J1.4 J2.1 J2.3 J2.4 J2.5 J2.6 J2.7 J2.9 J2.MH1 J2.MH2 J4.4 J5.MH1 J6.4 J11.1 J11.2 J11.3 J11.4 J11.5 J11.6 J11.8 J11.14 J11.20 J11.22 J11.32 J11.34 J11.35 J11.37 J11.38 J11.39 J11.40 J11.41 J11.43 J11.45 J11.47 J11.49 J11.MH1 J11.MH2 RA2.1 RA2.8 RA5.4 RA5.5 S2.4 S2.5 U1. U2.A3 U2.A4 U2.B3 U2.B4 U2.B5 U2.C3 U2.C4 U2.C5 U3.10 U3.11 U3.14 U3.15 U3.16 U3.18 U3.19 U3.21 U3.22 U3.23 U3.24 U7.1 U7.7 U7.8 U7.12 U7.13 U7.15 U7.16 U7.18 U7.21 U7.22 U7.23 U7.24 U8.5 U8.6 U8.9 U8.10 U8.12 U8.18 U8.19 U8.20 U8.28 U8.32 U8.36 U8.37 U8.38 U8.39 U8.40 U8.41 U8.42 U8.43 U9. U12.9@5898.44,4384.46 U12.9@5948.44,4384.46 U17.9@6799.78,3841 U17.9@6799.78,3891 U19.9@6621.18,3825.66 U19.9@6621.18,3875.27

## Polygon pours and split planes (outlines as drawn)
AR_1P0_RF1 on Top Layer "Top Layer-AR_1P0_RF1" (solid, remove dead copper, pour order 649): 3622.84,3727.73 3778.92,3727.73 3778.92,3831.26 3610.6,3831.26 3610.6,3739.75
GND on Top Layer "Sig1-GND 2" (solid, remove dead copper, pour order 832): 6459.32,4229.38 6459.32,3992.83 6215.85,3992.83 6215.85,4229.38 6299.65,4229.38 6299.65,4641.38 4400.86,4641.38 4400.86,3656.87 7367.76,3656.87 7367.76,4358 7219.14,4358 7219.14,4488.02 6618.99,4488.02 6618.99,4229.38
GND on Top Layer "Top Layer-GND 1" (solid, pour order 860): 3352.02,3690.19 3363.7,3701.87 3363.7,3858.21 3395,3889.52 3395,3954.52 3375,3974.52 3375,4039.52 3401.62,4039.52 3420.04,4057.94 3419.76,4163.82 3437,4163.25 3437,4055.41 3451.95,4039.52 3480,4039.52 3480,3974.52 3460,3954.52 3460,3889.52 3492.88,3856.64 3492.88,3676.94 3431.96,3676.94 3416.35,3661.33 3416.35,3618.9 3322.61,3618.9 3322.61,3690.19
PMIC_1V0 on Top Layer "Top Layer-PMIC_1V0" (solid, pour order 651): 3521.27,3650.25 3552.62,3618.9 3763,3618.9 3763,3700.57 3607.78,3700.57 3582.57,3725.77 3582.57,3878.09 3588.82,3884.34 3588.82,3962.83 3521.27,3962.83
GND on Top Layer "Top Layer-GND 5" (solid, remove dead copper, pour order 836): 3256.43,4679.43 3256.43,3618.9 2869.58,3618.9 2869.58,4679.43
AR_1P0_RF1 on Top Layer "Top Layer-AR_1P0_RF1 1" (solid, remove dead copper, pour order 180): 3693.6,4193.03 3735.64,4193.03 3777.43,4151.23 3862.16,4151.23 3862.16,4117.46 3693.6,4117.46
AR_1P0_RF2 on Top Layer "Top Layer-AR_1P0_RF2" (solid, remove dead copper, pour order 184): 3692.8,4107.78 3864.62,4107.78 3864.62,4045.8 3755.39,4045.8 3755.39,3989.76 3692.8,3989.76
VIN_5V_B on Top Layer "      " (solid, pour order 186): 6917.66,4278.57 7030.69,4278.57 7030.69,4341.43 6842.63,4341.43 6842.63,4209.57 6819.3,4186.24 6819.3,4158.51 6905.76,4158.51 6905.76,4266.67
GND on Top Layer "Top Layer-GND" (solid, pour order 862): 3454.24,4326.81 3479.96,4326.81 3479.96,4403.49 3459.96,4423.49 3459.96,4476.27 3489.96,4506.27 3489.96,4574.41 3364.49,4574.41 3364.49,4506.79 3394.96,4476.32 3394.96,4423.49 3374.96,4403.49 3374.96,4326.81 3400.35,4326.81 3410.28,4316.88 3419,4308.02 3419,4214.87 3439,4214.87 3439,4311.57
GND on Top Layer "Top Layer-GND 6" (solid, pour order 844): 3427.48,4128.37
5V_IN on Top Layer "TOP-5V_IN 1" (solid, pour order 166): 4492.93,3778 4588.97,3778 4588.97,3679.21 4492.93,3679.21
NetJ2_2 on Top Layer "Top Layer-NetJ2_2" (solid, pour order 828): 4806.74,3770.35 4806.74,3792.4 4729.81,3792.4 4729.81,3873.98 4913.31,3873.98 4913.31,3825.1 cw(c4883.91,3825.09) 4904.69,3804.3 4904.06,3803.66 ccw(c4923.41,3784.3) 4896.04,3784.3 4896.04,3770.35
5V_IN_B on Top Layer "Top Layer-5V_IN_B" (solid, remove dead copper, pour order 647): 6818.45,4144.21 6818.52,4133.31 6878.93,4133.31 6878.93,4115.45 6878.93,4045.97 6838.21,4045.97 6710.21,4045.97 6710.21,4144.21
5V_HD_IN on Top Layer "TOP-5V_IN_SW" (solid, pour order 446): 4795.77,3781.1 4629.86,3781.1 4629.86,3675.1 4795.77,3675.1
GND on Top Layer "Top Layer-GND 2" (solid, remove dead copper, pour order 798): 3604.51,3912.12 3610.61,3906.02 3610.61,3847.24 3680.34,3847.24 3680.34,3895.86 3680.34,4191.13 3624.87,4191.13 3624.87,4160.79 3636.76,4160.79 3636.76,3977 3604.51,3977
5V_IN on Top Layer "Top Layer-5V_IN 2" (solid, remove dead copper, pour order 671): 3500.98,4077.21 3500.98,4050.06 3516.26,4050.06 3516.25,3987.15 3594.49,3987.15 3594.49,4077.21
PMIC_1V8 on Top Layer "Top Layer-PMIC_1V8" (solid, pour order 816): 3207,3715.57 3329.65,3715.57 3329.65,3966.06 3255,3966.06 3255,3793.82 3246.82,3784.52 3207,3784.52
5V_IN on Top Layer "Top Layer-5V_IN" (solid, remove dead copper, pour order 814): 3508.62,4391.71 3586.15,4391.71 3586.15,4315.47 3580.69,4310.01 3514.84,4310.01 3508.62,4316.23
PMIC_1V2 on Top Layer "Top Layer-PMIC_1V2" (solid, remove dead copper, pour order 665): 3233.33,4551.48 3241.14,4543.68 3241.09,4412.42 3311.94,4412.42 3311.94,4573.58 3294.31,4573.58 3270.51,4597.88 3270.29,4661.34 3148.38,4661.34 3148.38,4551.48
AR_1P2 on Top Layer "Top Layer-AR_1P2" (solid, remove dead copper, pour order 659): 3299.36,4586.16 3287.57,4597.95 3287.23,4598.23 3287.23,4667.19 3369.41,4667.19 3369.41,4586.16
GND on Top Layer "Top Layer-GND 4" (solid, remove dead copper, pour order 810): 3631,4270 3682,4270 3682,4205 3631,4205
GND on Top Layer " " (solid, remove dead copper, pour order 752): 3883.7,3985.39 4211.48,3985.39 4211.48,4302.34 3883.7,4302.34
VCC_BA_3V3 on Top Layer "Top Layer-VCC_BA_3V3" (solid, remove dead copper, pour order 768): 4832.84,4637.18 4910.97,4637.18 4918.95,4629.19 4918.95,4544.77 4916.82,4542.64 4849.86,4542.64 4832.84,4559.66
PMIC_3V3 on Top Layer "Top Layer-PMIC_3V3 2" (solid, remove dead copper, pour order 766): 4819.62,4637.18 4819.62,4563.95 4766.02,4563.95 4766.02,4637.18
PMIC_3V3 on Top Layer "Top Layer-PMIC_3V3 1" (solid, remove dead copper, pour order 754): 3010.94,4386.79 3010.94,4443.24 3027.09,4459.4 3166.55,4459.4 3166.55,4386.79
USB_5V on Top Layer "Top Layer-USB_5V" (solid, pour order 750): 3063.11,4081.47 3153.22,4081.47 3153.22,4171.61 3063.11,4171.61
NetD1_2 on Top Layer "Top Layer-NetD1_2" (solid, pour order 736): 3089.22,4074.59 3164.79,4074.59 3164.79,3955 3089.22,3955
5V_IN on Top Layer "Top Layer-5V_IN 4" (solid, pour order 675): 2922.29,3910 3060.17,3910 3083.17,3933 3179.96,3933 3179.96,3827.52 2922.29,3827.52
5V_IN on Top Layer "Top Layer-5V_IN 3" (solid, remove dead copper, pour order 673): 3353.98,4077.21 3353.98,4050.06 3338.7,4050.06 3338.7,3978.23 3260.47,3978.23 3260.47,4077.21
AR_1V8 on Top Layer "Top Layer-AR_1V8" (solid, remove dead copper, pour order 669): 3197.24,3784.52 3197.24,3697.61 3285.71,3697.61 3285.71,3618.9 3114.34,3618.9 3114.34,3784.52
5V_IN on Top Layer "Top Layer-5V_IN 1" (solid, remove dead copper, pour order 667): 3353.98,4300.8 3353.98,4327.95 3338.7,4327.95 3338.7,4399.78 3260.47,4399.78 3260.47,4300.8
PMIC_3V3 on Top Layer "Top Layer-PMIC_3V3" (solid, remove dead copper, pour order 657): 3536.85,4651.65 3536.85,4413.49 3624.53,4413.49 3624.53,4651.65
RE on Top Layer "Bottom Layer-RE" (solid, remove dead copper, pour order 334): 7331.54,4438.37 7307.92,4438.37 7307.92,4627.35 7331.54,4627.35
GND on Top Layer " " (solid, remove dead copper, pour order 495): 7233.51,4641.4 7233.51,4515.96 6600.52,4515.97 6600.52,4242.13 6357.55,4242.12 6357.55,4641.29
no net on Top Layer " " (solid, remove dead copper, pour order 643): 6030.79,4320.34
no net on Top Layer "Top Layer-No Net" (solid, remove dead copper, pour order 645): 6335,4190
no net on Top Layer "TOP-No Net 2" (solid, pour order 489): 6159.44,4021.48
no net on Top Layer "TOP-No Net" (solid, pour order 430): 6163.15,4205.41
GND on Bottom Layer "Bottom Layer-GND" (solid, remove dead copper, pour order 878): 4154.92,3910.72 4160.18,3905.46 4197.05,3905.46 4218.8,3883.71 4223.68,3878.83 4223.68,3835.22 4223.68,3780.47 4119.65,3780.47 4119.65,3826.3 3814.73,3826.94 3814.73,3619 4400.86,3619 4400.86,3656.87 7367.76,3656.87 7367.76,4357.96 7230.16,4357.96 7230.16,4641.43 4400.86,4641.43 4400.86,4286.48 4119.65,4287.07 4119.65,4266.74 4008.5,4266.74 4008.5,4031.3 4119.65,4031.3 4119.65,3911.66 4120.78,3910.72
GND on Bottom Layer "GND" (solid, pour order 894): 4078.16,3900.61 4093.83,3900.61 4096.97,3897.47 4096.97,3885.14 4100.94,3881.17 4129.99,3881.17 4147.13,3898.31 4169.52,3898.31 4171.36,3896.47 4171.36,3866.63 4169.51,3864.78 4083.4,3864.78 4078.16,3870.03
GND on Bottom Layer "GND" (solid, pour order 892): 3899.59,3848.81 3901.99,3846.41 3931.54,3846.41 3936.73,3851.62 3936.73,3876.73 3944.38,3884.38 3970.71,3910.72 3970.67,3951.94 3962.76,3959.85 3928.09,3959.85 3922.3,3954.05 3922.3,3896.41 3899.59,3873.69
GND on Bottom Layer "GND" (solid, pour order 890): 3982.03,3900.86 4034,3901.01 4037.85,3897.16 4037.85,3839.65 4034.09,3835.9 3981.77,3835.9 3977.6,3840.07 3977.6,3896.44
GND on Bottom Layer "GND" (solid, remove dead copper, pour order 888): 3763.2,3991.74 3765.61,3994.16 3846.5,3994.16 3860.43,3980.23 3877.77,3980.23 3881.32,3976.68 3881.32,3955.21 3871.66,3945.55 3843.8,3945.55 3840.67,3942.42 3796.6,3942.42 3787.65,3951.37 3787.65,3969.29 3784.09,3972.84 3767.75,3972.84 3763.48,3977.1 3763.48,3991.6
GND on Bottom Layer "3v3" (solid, pour order 884): 3655.99,4207.12 3837.93,4207.12 3846.85,4198.19 3846.85,4167.5 3843.52,4164.17 3684.96,4164.17 3681.27,4160.48 3681.27,4134.16 3673.88,4126.78 3634.36,4126.78 3629.15,4131.99 3629.15,4180.28
AR_1P0_RF2 on Bottom Layer "Bottom Layer-AR_1P0_RF2" (solid, remove dead copper, pour order 715): 3584.17,3684.8 3575,3693.97 3447.64,3693.97 3447.64,3827.02 3463.59,3842.97 3463.59,4114.97 3850.57,4114.97 3850.57,4123.81 3901.57,4123.81 3901.57,3988.64 3857.37,3988.64 3840.08,4005.93 3615.55,4005.93 3560.24,3950.62 3560.24,3809.89 3630.87,3738.52 3630.87,3632.23 3584.17,3632.23
GND on Bottom Layer "3v3" (solid, pour order 882): 3598.93,3925.22 3603.65,3920.5 3663.91,3920.5 3669,3925.22 3669,3987.35 3665.53,3990.82 3608,3990.82 3608.2,3990.33 3598.93,3981.06
GND on Bottom Layer "Bottom Layer-GND 10" (solid, pour order 880): 3569.04,3677.61 3443.4,3677.61 3428.01,3662.22 3428.01,3626.7 3569.04,3626.7
GND on Bottom Layer "Bottom Layer-GND 1" (solid, remove dead copper, pour order 872): 4400.86,4680.01 4400.86,4459.04 3464.91,4459.04 3464.91,4681.06
GND on Bottom Layer "Bottom Layer-GND 4" (solid, remove dead copper, pour order 868): 3453.87,3851.35 3435.67,3833.16 3435.67,3689.11 3413.42,3666.86 3413.42,3618.93 3291.07,3619 2869.59,3619 2869.27,4679.44 3599.38,4679.44 3599.38,4171.06 3567.24,4138.92 3468.46,4138.92 3453.87,4124.33
GND on Bottom Layer "Bottom Layer-GND 6" (solid, remove dead copper, pour order 866): 3004.61,4191.68 3001.51,4194.78 3001.51,4270.43 3010.47,4279.38 3054.7,4279.38 3062.57,4271.51 3062.57,4193.36 3060.81,4191.61 3004.87,4191.61
GND on Bottom Layer "Bottom Layer-GND 7" (solid, pour order 858): 3915.95,4201.08 3915.95,4202.85 3996.51,4202.85 3996.51,4133.63 3915.95,4133.63
VDDR on Bottom Layer "Bottom Layer-VDDR" (solid, pour order 856): 6453.28,4049.95
GND on Bottom Layer "Bottom Layer-GND 7" (solid, pour order 826): 3915.95,4273.08 3915.95,4274.85 3996.51,4274.85 3996.51,4211.67 3915.95,4211.67
GND on Bottom Layer "Bottom Layer-GND 8" (solid, pour order 824): 4008.94,4020.83 4008.81,4023.67 4061.51,4023.67 4109.07,4023.49 4109.07,3980.27 4008.94,3980.27
GND on Bottom Layer "Bottom Layer-GND 9" (solid, pour order 822): 4008.5,4031.3
NetJ2_2 on Bottom Layer "Bottom Layer-NetJ2_2" (solid, pour order 812): 4801.23,3864.59 4947.97,3864.59 4947.97,3855.45 cw(c4942.84,3855.45) 4942.84,3850.31 4920.85,3829.22 4908.1,3808.02 4896.04,3778.48 4895.06,3771.05 4894.92,3771.19 4802.41,3771.19 4801.3,3772.3 4801.3,3864.69
no net on Bottom Layer "Bottom Layer-No Net 1" (solid, pour order 796): 3254.94,3794.88 3255,3784.52 3245.82,3784.52
USB_5V on Bottom Layer "Bottom Layer-USB_5V" (solid, remove dead copper, pour order 784): 3065.42,4075.83 3058.31,4075.83 cw(c3058.31,4081.29) 3052.85,4081.29 3001.1,4081.29 3001.1,4109.86 3066.9,4109.86 3070.95,4114.47 3070.95,4168.22 3144.18,4168.22 3144.18,4088.9 3131.11,4075.83
PMIC_3V3 on Bottom Layer "Bottom Layer-PMICOUT_3V3" (solid, remove dead copper, pour order 693): 4308.45,4059.57 4308.45,4015.14 4292.6,4015.14 4292.6,3991.49 4292.6,3925.72 4214.41,3925.72 4214.41,4078.58 4264.91,4129.09 4382.66,4129.09 4382.67,4059.57